# Altium PCB PCB3.PcbDoc
Units mm, origin at the board's own origin, x right, y up, seen from the top; angles counter-clockwise.
Board outline 40 x 25 mm, 2 copper layers (Top Layer, Bottom Layer); 11 components, 8 nets, 43 pads, 13 vias.
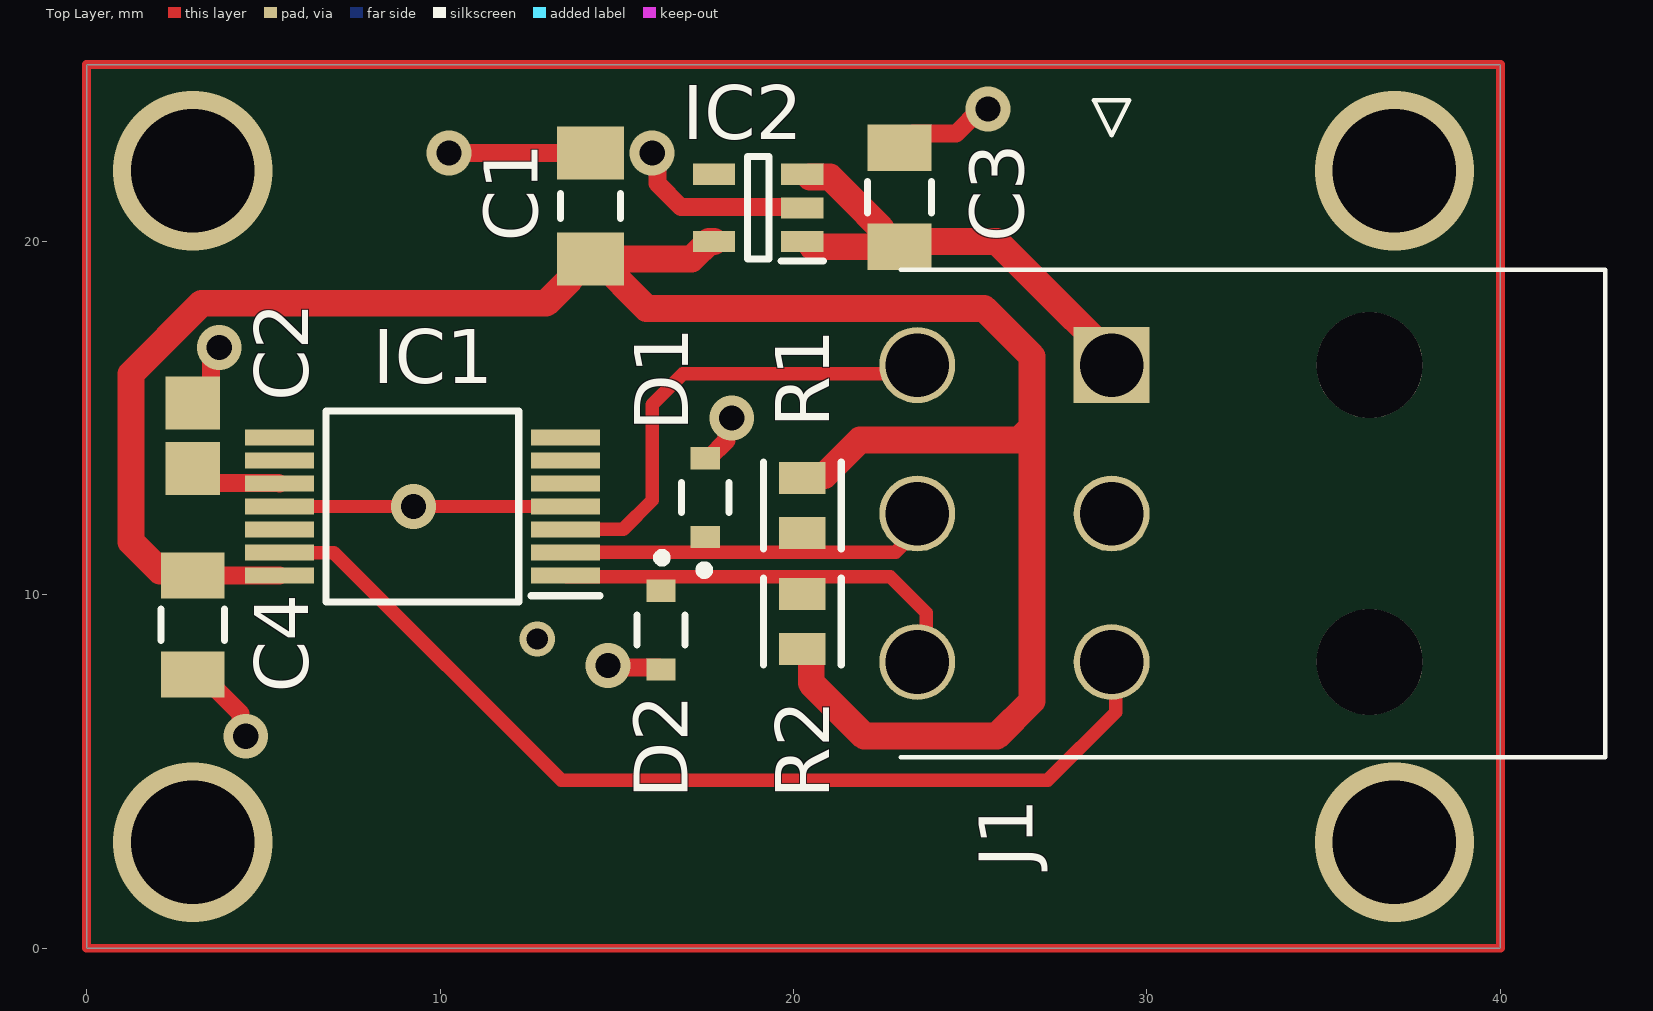
[diagram p0: Top Layer view]
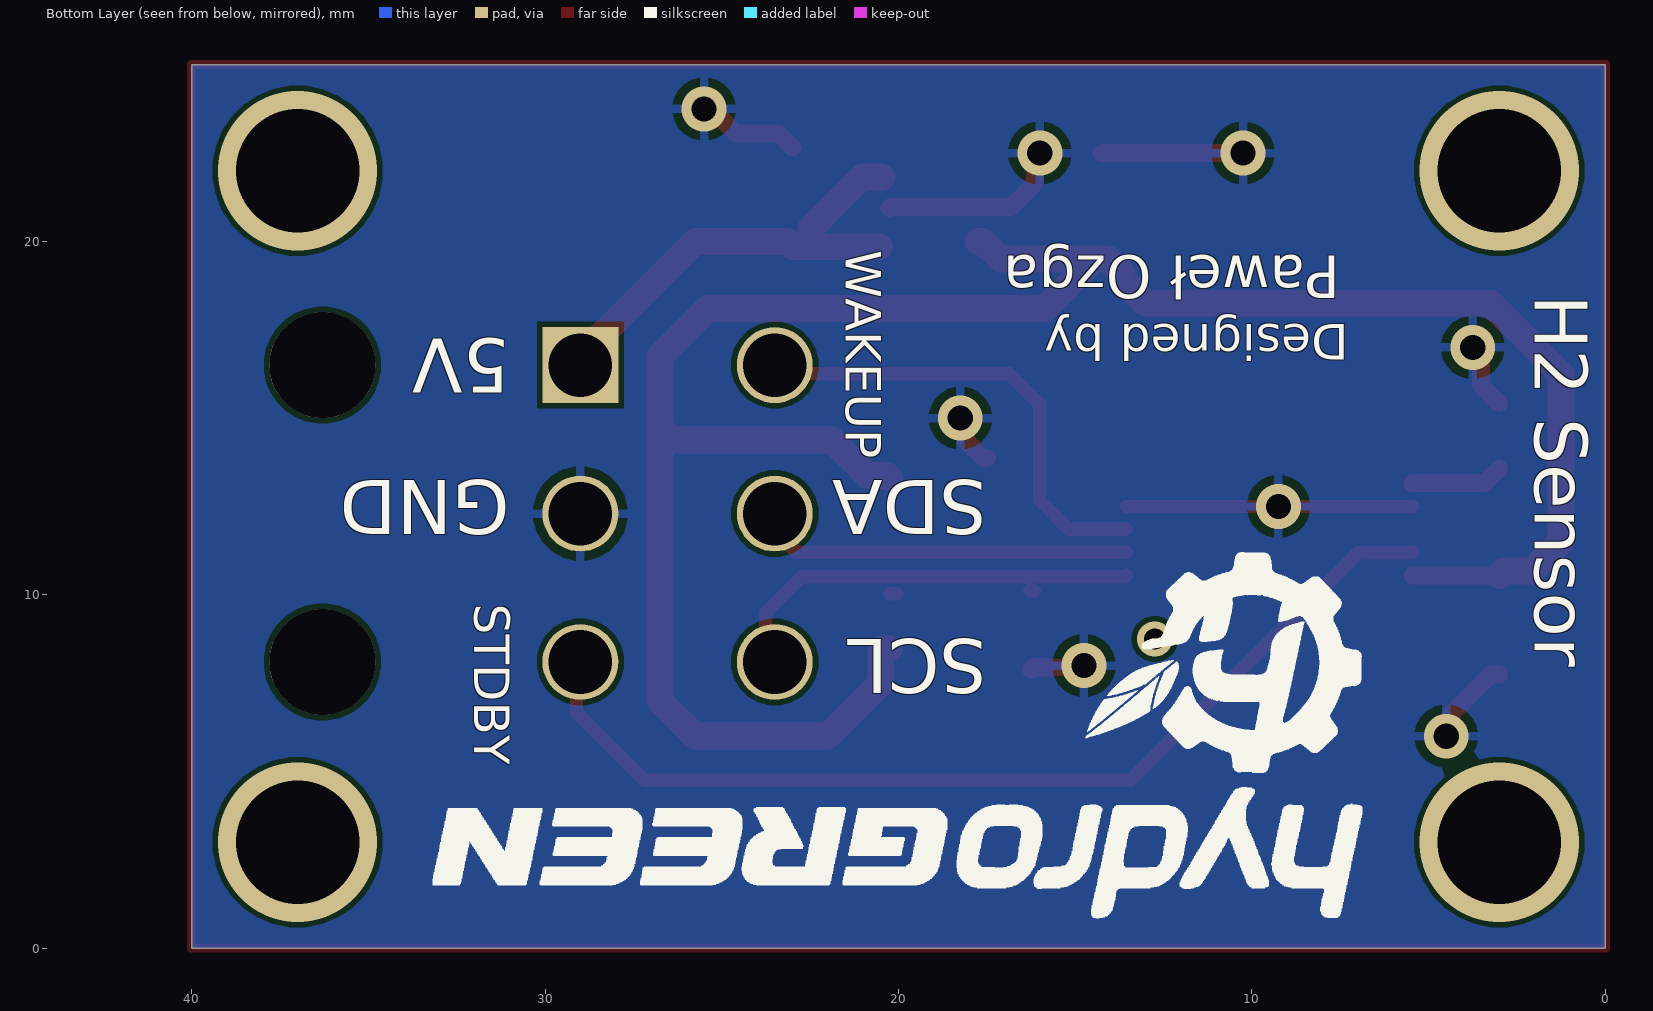
[diagram p1: Bottom Layer view, seen from below]
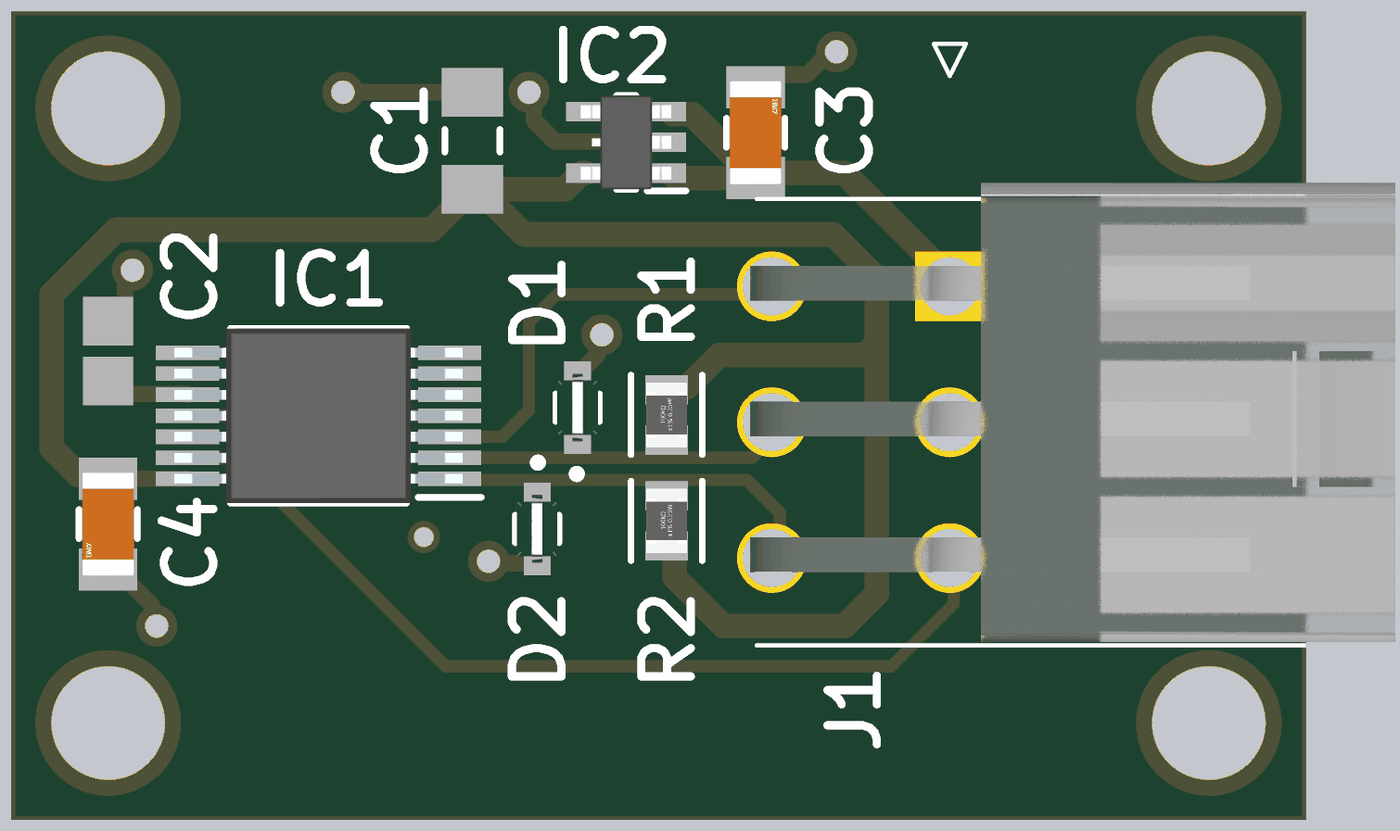
[diagram p2: 3D render of the assembled board from above, using the file's embedded part models]

## Layer stack, top to bottom
Top Solder: solder mask 0.0102, Solder Resist, Dk 3.5
Top Layer: signal copper 0.0356
Dielectric 1: dielectric 0.32, FR-4, Dk 4.8
Bottom Layer: signal copper 0.0356
Bottom Solder: solder mask 0.0102, Solder Resist, Dk 3.5

## Board outline
0,0 0,25 40,25 40,0

## Design rules (kind name [scope] priority, off if disabled: settings)
Clearance [All] p1: gap=0.15 ignorepadtopadclearanceinfootprint=FALSE
PolygonConnect [All] p1: connectstyle=Relief reliefconductorwidth=0.254 reliefentries=4 polygonreliefangle="90 Angle" airgapwidth=0.254
RoutingVias [All] p1: holewidth=0.711 width=1.27 viastyle="Through Hole" minholewidth=0.711 minwidth=1.27 maxholewidth=0.711 maxwidth=1.27
SolderMaskExpansion [All] p1: expansion=0 istentingtop=FALSE
SupplyNets "Schematic Supply Nets_2" [InNet('3V3')] p1: voltage=0.000
SupplyNets "Schematic Supply Nets_1" [InNet('+5')] p2: voltage=0.000
SupplyNets "Schematic Supply Nets" [InNet('GND')] p3: voltage=0.000
Width [All] p1: maxlimit=0.762 minlimit=0.254 preferedwidth=0.508 minimp=50.000000 maximp=50.000000 favimp=50.000000
30 further rules are at their usual default settings.

## Components (designator, comment, footprint, x,y, rotation, side; value= is the part's Value field where it differs from the comment)
C1 "100nF" KEMT-1206-2_M 14.25,21 r90 top
C2 "10nF" CAPC2013X145X48ML20T23 3,14.5 r270 top
C3 "1uF" FP-1206-L_3_2_0_2-W_1_6_0-IPC_B 23,21.25 r90 top
C4 "1uF" FP-1206-L_3_2_0_2-W_1_6_0-IPC_B 3,9.151 r270 top
D1 "ESD7351HT1G" FP-477-02-MFG 17.5,12.75 r90 top
D2 "ESD7351HT1G" FP-477-02-MFG 16.25,9 r270 top
IC1 "TCIXTMA1" SOP65P890X370-14N 9.5,12.5 r180 top
IC2 "TPS7A0233PDBVR" SOT95P280X145-5N 19,20.95 r180 top
J1 "39-30-1060" 39-30-106Y_012 29,16.5 r90 top
R1 "2k2" FP-CRGP0805-IPC_C 20.25,12.526 r90 top value=2.2KΩ
R2 "2k2" FP-CRGP0805-IPC_C 20.25,9.25 r90 top value=2.2KΩ

## Footprints (in the part's own frame and the unit in brackets; to place one, negate y for a bottom-side part, rotate by r counter-clockwise, add the part's x,y. Pads: shape width x height; smd on the part's side, far side on the other; paste and mask are expansions set on the pad)
39-30-106Y_012 [mm]
  rect 2.15x2.15 hole 1.8: 1(0,0)
  round 2.15 hole 1.8: 2(-4.2,0) 3(-8.4,0) 4(0,5.5) 5(-4.2,5.5) 6(-8.4,5.5)
  round 3 hole 3 unplated: 7(0,-7.3) 8(-8.4,-7.3)
  silkscreen extent -11.1,-13.97 7.5,5.97, body extent -11,-13.76 3.2,6.17, height 11.37
CAPC2013X145X48ML20T23 [mm] "Chip Capacitor, 2-Leads, Body 2.00x1.25mm, IPC Low Density"
  rect 1.5x1.55 smd: 1(-0.925,0) 2(0.925,0)
  body extent -1.1,-0.72 1.1,0.72, height 1.45
FP-477-02-MFG [mm]
  rect 0.63x0.83 smd paste+0 mask+0: 1(-1.115,0) 2(1.115,0)
  silkscreen extent -2.17,-0.67 0.43,0.67, body extent -1.53,-0.77 1.53,0.77, height 0.25
FP-1206-L_3_2_0_2-W_1_6_0-IPC_B [mm]
  rect 1.305x1.806 smd paste+0 mask+0: 1(-1.401,0) 2(1.401,0)
  silkscreen extent -0.45,-0.9 0.45,0.9, body extent -2.3,-1.15 2.3,1.15, height 0.25
FP-CRGP0805-IPC_C [mm]
  rect 0.906x1.31 smd paste+0 mask+0: 1(-0.776,0) 2(0.776,0)
  silkscreen extent -1.23,-1.1 1.23,1.1, body extent -1.33,-0.8 1.33,0.8, height 0.25
KEMT-1206-2_M [mm] "SMD, 2-Leads, Body 3.4x1.8mm, IPC Low Density"
  rect 1.5x1.9 smd: 1(-1.5,0) 2(1.5,0)
  silkscreen extent -0.35,-0.85 0.35,0.85, body extent -1.7,-0.9 1.7,0.9, height 0.88
SOP65P890X370-14N [mm]
  rect 1.95x0.45 smd: 1(-4.05,1.95) 2(-4.05,1.3) 3(-4.05,0.65) 4(-4.05,0) 5(-4.05,-0.65) 6(-4.05,-1.3) 7(-4.05,-1.95) 8(4.05,-1.95) 9(4.05,-1.3) 10(4.05,-0.65) 11(4.05,0) 12(4.05,0.65) 13(4.05,1.3) 14(4.05,1.95)
  silkscreen extent -5.02,-2.7 2.73,2.7, body extent -4.45,-2.7 4.45,2.7, height 3.7
SOT95P280X145-5N [mm]
  rect 1.2x0.6 smd: 1(-1.25,0.95) 2(-1.25,0) 3(-1.25,-0.95) 4(1.25,-0.95) 5(1.25,0.95)
  silkscreen extent -1.85,-1.45 0.3,1.5, body extent -1.4,-1.45 1.4,1.45, height 1.2

## Part data
C1: library part CMP-1037-04202-2, "CAP, Ceramic, 0.1 uF, +/- 10%, 50 V, -55 to 125 degC, 1206 (3216 Metric), RoHS, Tape and Reel", Capacitance=0.1µF, Capacitance Tolerance=±10%, Capacitor Case Style=1206[3216Metric], Dielectric Characteristic=X7R, Manufacturer=Kemet, Operating Temperature Max=125degC, Operating Temperature Min=-55degC, Package Description="2-Leads SMD, Body 3.2 x 1.6 mm", Package Reference=1206-2, Voltage Rating=50V, Datasheet URL=https://datasheet.ciiva.com/6125/1725438-6125494.pdf, Datasheet Version=Jul-13, Manufacturer URL=http://www.kemet.com/, Packaging=Tape&Reel, Product Range=KEMET-CSeries, SVHC=ToBeAdvised
C2: library part CMP-2007-01698-1, Manufacturer=Vitramon, Part Number=VJ0805Y103KXBMC
C3 C4: library part CMP-04427-010925-1, "Automotive Ceramic Capacitor, 1206, 1uF, 5%, X7R, 15%, 50V", Case/Package=1206, Dielectric=X7R, Max Operating Temperature=125°C, Min Operating Temperature=-55°C, Package Quantity=2000, Ratings=AEC-Q200, Tolerance=5%, Voltage Rating=50V, Capacitance=1uF, Length=0.126inch, Mount="Surface Mount", Packaging="Tape and Reel", RoHS Compliant=Yes, Thickness=0.037inch, Voltage Rating (DC)=50V, Width=0.063inch
D1 D2: library part CMP-00278-47358424-1, "ESD7351HT1G ESD7351 Series 5 V 0.6 pF Uni-Directional ESD Protection Diode - SOD-323", Breakdown Voltage=5V, Capacitance=430fF, Case/Package=SOD, Clamping Voltage=10V, Manufacturer Lifecycle Status=ACTIVE, Max Junction Temperature (Tj)=150°C, Min Operating Temperature=-55°C, Peak Pulse Current=3A, Peak Pulse Power=150mW, Power Line Protection=No, Reverse Standoff Voltage=3.3V, Composition=Zener, Direction=Unidirectional, Height=1mm, Lead Free="Lead Free", Lifecycle Status=Production, Max Operating Temperature=150°C, Min Breakdown Voltage=5V, Mount="Surface Mount", NexarPartId=47358424, Number of Channels=1, Number of Unidirectional Channels=1, Packaging="Tape & Reel (TR)", RoHS=Compliant, Schedule B=8536300000
IC1: "Integrated Circuit", Manufacturer_Name=Infineon, Datasheet Link=https://www.infineon.com/assets/row/public/documents/24/49/infineon-tci-datasheet-en.pdf, Height=3.7mm, Manufacturer_Part_Number=TCIXTMA1
IC2: "Integrated Circuit", Manufacturer_Name="Texas Instruments", Mouser Part Number=595-TPS7A0233PDBVR, Arrow Part Number=TPS7A0233PDBVR, Arrow Price/Stock=https://www.arrow.com/en/products/tps7a0233pdbvr/texas-instruments.html?utm_currency=USD&region=nac, Datasheet Link=https://www.ti.com/lit/gpn/TPS7A02, Height=1.45mm, Manufacturer_Part_Number=TPS7A0233PDBVR, Mouser Price/Stock=https://www.mouser.co.uk/ProductDetail/Texas-Instruments/TPS7A0233PDBVR?qs=OlC7AqGiEDmMDf5GlW%2FWnQ%3D%3D
J1: "Connector", Manufacturer_Name=Molex, Mouser Part Number=538-39-30-1060, Datasheet Link=https://www.molex.com/pdm_docs/sd/039300020_sd.pdf, Height=10mm, Manufacturer_Part_Number=39-30-1060, Mouser Price/Stock=https://www.mouser.co.uk/ProductDetail/Molex/39-30-1060?qs=tRPrwvvr%2FujbUr18ehTIWQ%3D%3D
R1 R2: library part CMP-03211-003253-1, "CRGP0805 2.2KΩ 0.33W ±100ppm/°C 1% 150V", Ambient Temperature Range High=+70°C, Manufacturer=TE, Manufacturer Part Number=CRGP0805F2K2, Package=CRGP0805, Power Rating=0.33W, Resistance=2.2KΩ, Temperature="-55°C to +155°C", Temperature Coefficient=±100ppm/°C, Temperature Range High=+155°C, Temperature Range Low=-55°C, Tolerance=0.01, Voltage Rating=150V, Automotive=No, Category=Res, ComponentLink2Description=Datasheet, ComponentLink2URL=https://www.mouser.com/datasheet/2/418/NG_DS_9-1773463-9_A-1358566.pdf, Composition="Thick Film", Device Class L1="Passive Components", Device Class L2=Resistors, Device Class L3="Chip SMD Resistors", Height=0.65mm, Ipc Land Pattern Name=RESC200125X55, Lead Free=Yes, Octopart=https://octopart.com/crgp0805f2k2-te+connectivity-91018809, RoHS=TRUE, Series=CRGP

## Via types
v1: diameter 1.27, hole 0.711, Top Layer to Bottom Layer, tented top, 8 vias
v2: diameter 4.5, hole 3.5, Top Layer to Bottom Layer, tented top, 4 vias
v3: diameter 1, hole 0.6, Top Layer to Bottom Layer, tented top, 1 vias

## Nets (pads, with @x,y where several pads share a name; then routed paths per layer and width w, separated by ;. In a path a pad name is that pad's centre, name@x,y a point inside that pad or via, vN(x,y) a via of type N, cw(c..) or ccw(c..) an arc to the next point about the centre after c; other vN are vias at no path point)
3V3: C1.1 C4.1 IC1.14 IC2.5 R1.2 R2.1 | length 66.5
  Top Layer w0.508: C4.1 IC1.14@5.449,10.551
  Top Layer w0.762: C4.1 2.879,10.672 2.078,10.672 1.25,11.5 1.25,16.25 3.25,18.25 13,18.25 13.681,18.931 13.681,19.131 14.05,19.5 C1.1 ; IC2.5 17.612,20 17.112,19.5 C1.1 ; R2.1 20.428,8.474 20.5,8.402 20.5,7.5 22,6 25.75,6 26.75,7 26.75,14.38 26.75,14.75 ; R1.2 20.322,13.374 20.874,13.374 21.88,14.38 26.38,14.38 26.75,14.75 ; C1.1 14.45,19.5 15.844,18.106 25.394,18.106 26.75,16.75 26.75,14.75
+5: C3.1 IC2.1 IC2.3 J1.1 | length 13.6
  Top Layer w0.762: IC2.3@20.469,21.819 21.032,21.819 21.609,21.242 21.609,21.24 22.478,20.371 22.478,20.121 22.749,19.849 C3.1 ; IC2.1@20.539,19.849 22.478,19.849 C3.1 ; J1.1 28.556,16.944 28.556,17.194 27.372,18.378 25.75,20 23.151,20 C3.1
GND: C1.2 C2.1 C3.2 C4.2 D1.2 D2.2 IC1.4 IC1.11 IC2.2 J1.2 | length 27.8
  Top Layer w0.381: IC1.11 IC1.4
  Top Layer w0.508: C4.2 3.251,7.75 4.354,6.647 4.354,6.146 v1(4.5,6) ; C2.1 3.025,15.425 3.521,15.921 3.521,16.565 3.75,16.794 v1(3.75,17) ; v1(10.25,22.5) C1.2 ; v1(14.75,8) 14.807,7.943 16.192,7.943 D2.2 ; v1(16,22.5) 16.146,22.354 16.146,21.639 16.81,20.975 20.225,20.975 IC2.2 ; D1.2 17.6,13.865 18.104,14.369 18.104,14.854 v1(18.25,15) ; C3.2 23.398,23.049 24.593,23.049 25.294,23.75 v1(25.5,23.75)
  other v1: 9.25,12.5
NetC2_2: C2.2 IC1.10 | length 2.6
  Top Layer w0.508: C2.2 3.404,13.171 5.429,13.171 IC1.10
SCL: D2.1 IC1.1 J1.6 R2.2 | length 12.5
  Top Layer w0.381: IC1.1 13.584,10.515 22.735,10.515 23.753,9.497 23.753,8.353 J1.6 ; D2.1@16.15,10.115 D2.1 D2.1@16.278,10.143 ; R2.2@20.048,10.026 R2.2
SDA: D1.1 IC1.2 J1.5 R1.1 | length 10.7
  Top Layer w0.381: IC1.2 22.892,11.2 22.892,11.214 23.5,11.821 J1.5
STDBY: IC1.13 J1.3 | length 28.8
  Top Layer w0.381: IC1.13 5.465,11.185 6.997,11.185 13.432,4.75 27.187,4.75 29.113,6.677 29.113,7.536 29.338,7.762 J1.3
Wakeup: IC1.3 J1.4 | length 13.5
  Top Layer w0.381: IC1.3 15.175,11.85 16,12.675 16,15.386 16.864,16.25 23.25,16.25 J1.4
pads on no net: IC1.5 IC1.6 IC1.7 IC1.8 IC1.9 IC1.12 IC2.4 J1.7 J1.8
copper on no net: | length 130
  Top Layer w0.254: 0,0 40,0 40,25 0,25 0,0
  other v2: 3,3 37,3 3,22 37,22
  other v3: 12.75,8.75

## Polygon pours and split planes (outlines as drawn)
GND on Bottom Layer "GND_L02_P000" (solid, pour order 0): 0,25 0,0 40,0 40,25

## Silkscreen, mask and mechanical layers (free items; w line width, h text height)
Bottom Overlay:
  drawing of 16 lines, arcs and shapes, not listed
  text "WAKEUP" at 21.496,19.746 h1 r90
  text "Paweł Ozga" at 7.504,19.596 h1.2 r180
  text "H2 Sensor" at 1.996,18.496 h1.5 r90
  text "Designed by" at 7.254,17.663 h1 r180
  text "5V" at 31.004,17.246 h1.52 r180
  text "SDA" at 17.504,13.246 h1.52 r180
  text "GND" at 31.004,13.246 h1.52 r180
  text "STDBY" at 31.996,9.746 h1 r90
  text "SCL" at 17.504,8.746 h1.52 r180